# Altium PCB PCB1.PcbDoc
Units mil, origin at the board's own origin, x right, y up, seen from the top; angles counter-clockwise.
Board outline 1820 x 1620 mil, 2 copper layers (Top Layer, Bottom Layer); 51 components, 47 nets, 263 pads, 229 vias.
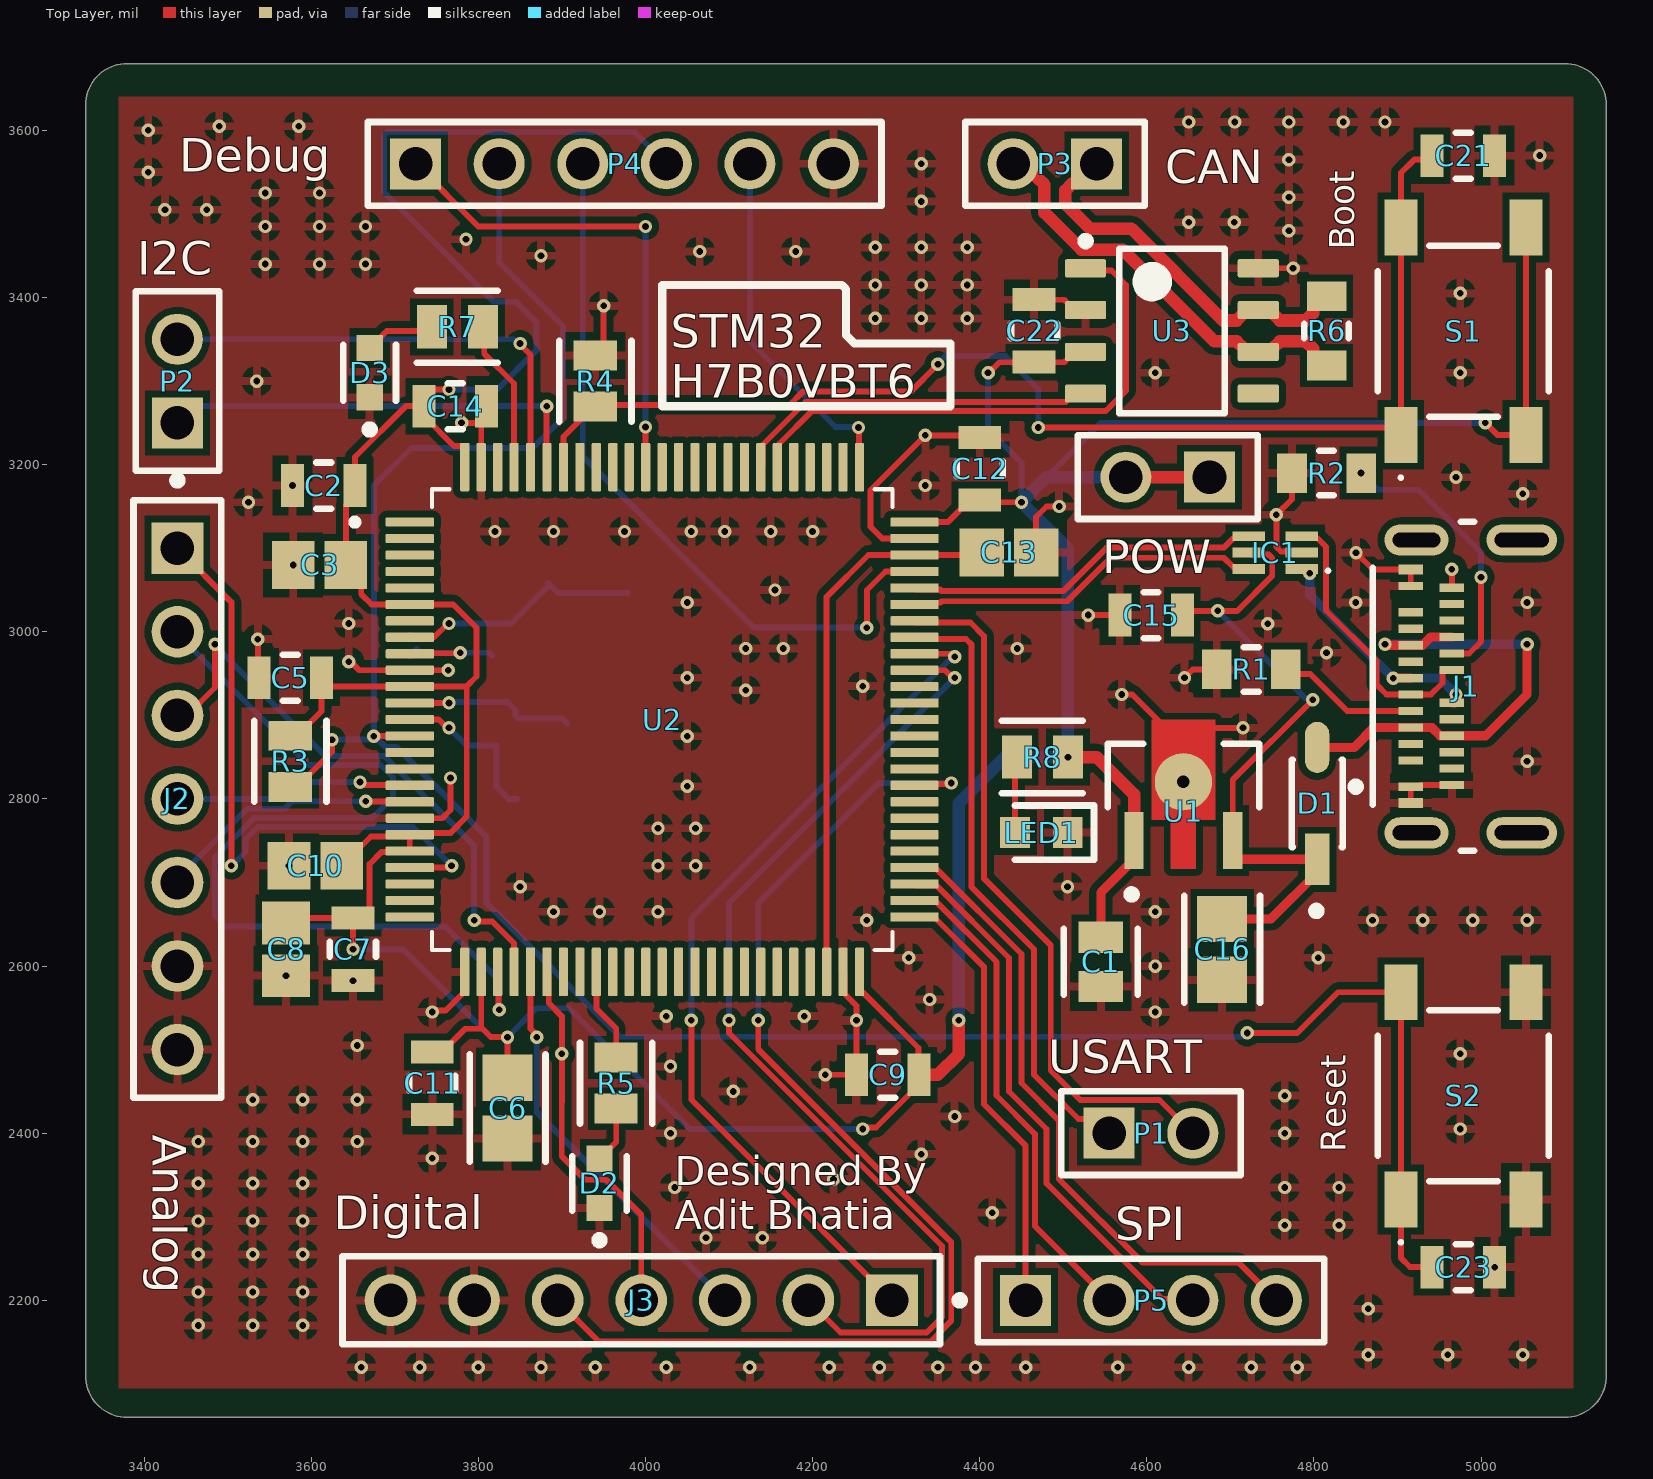
[diagram p0: Top Layer view]
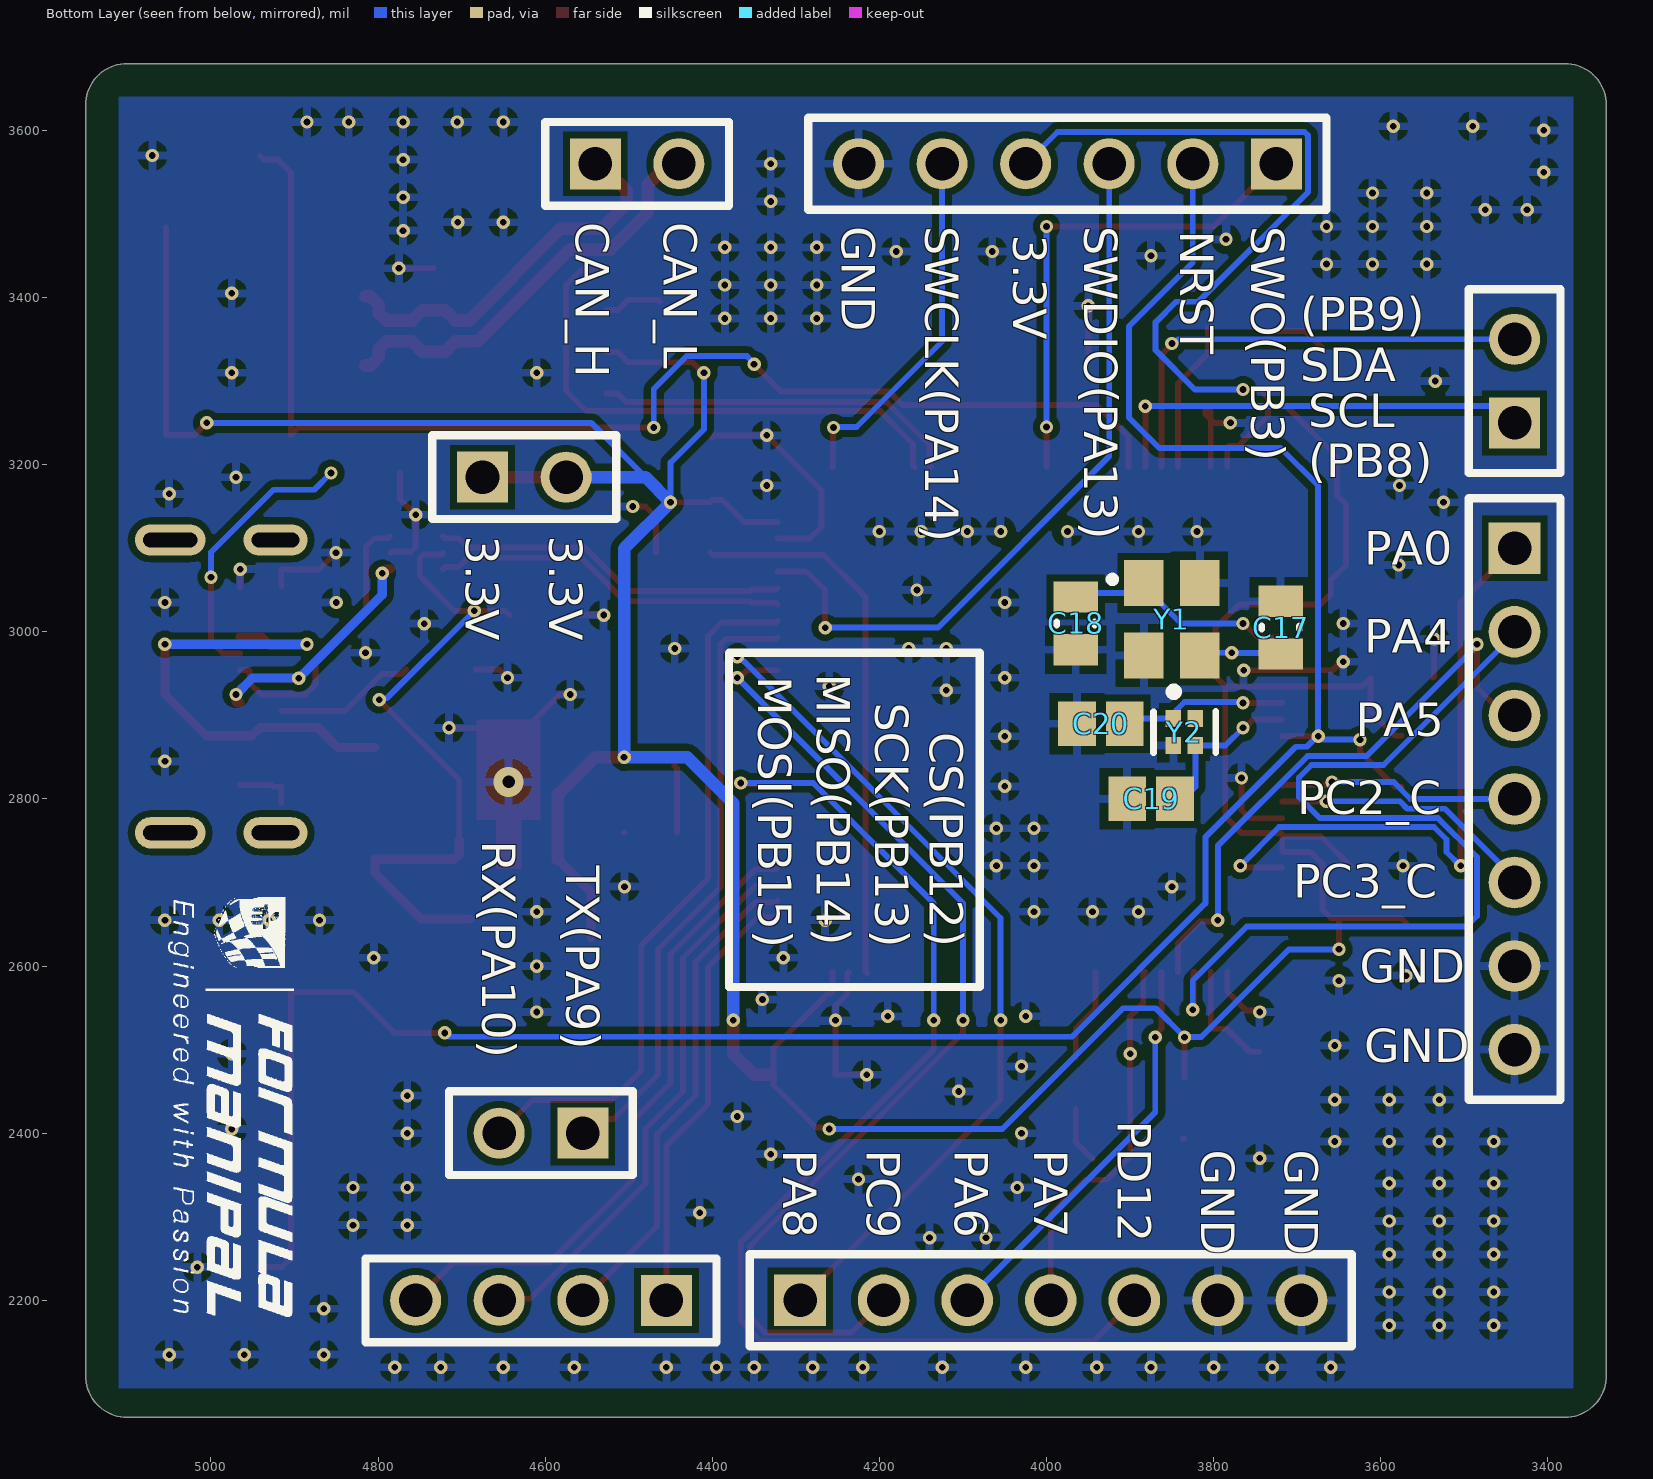
[diagram p1: Bottom Layer view, seen from below]
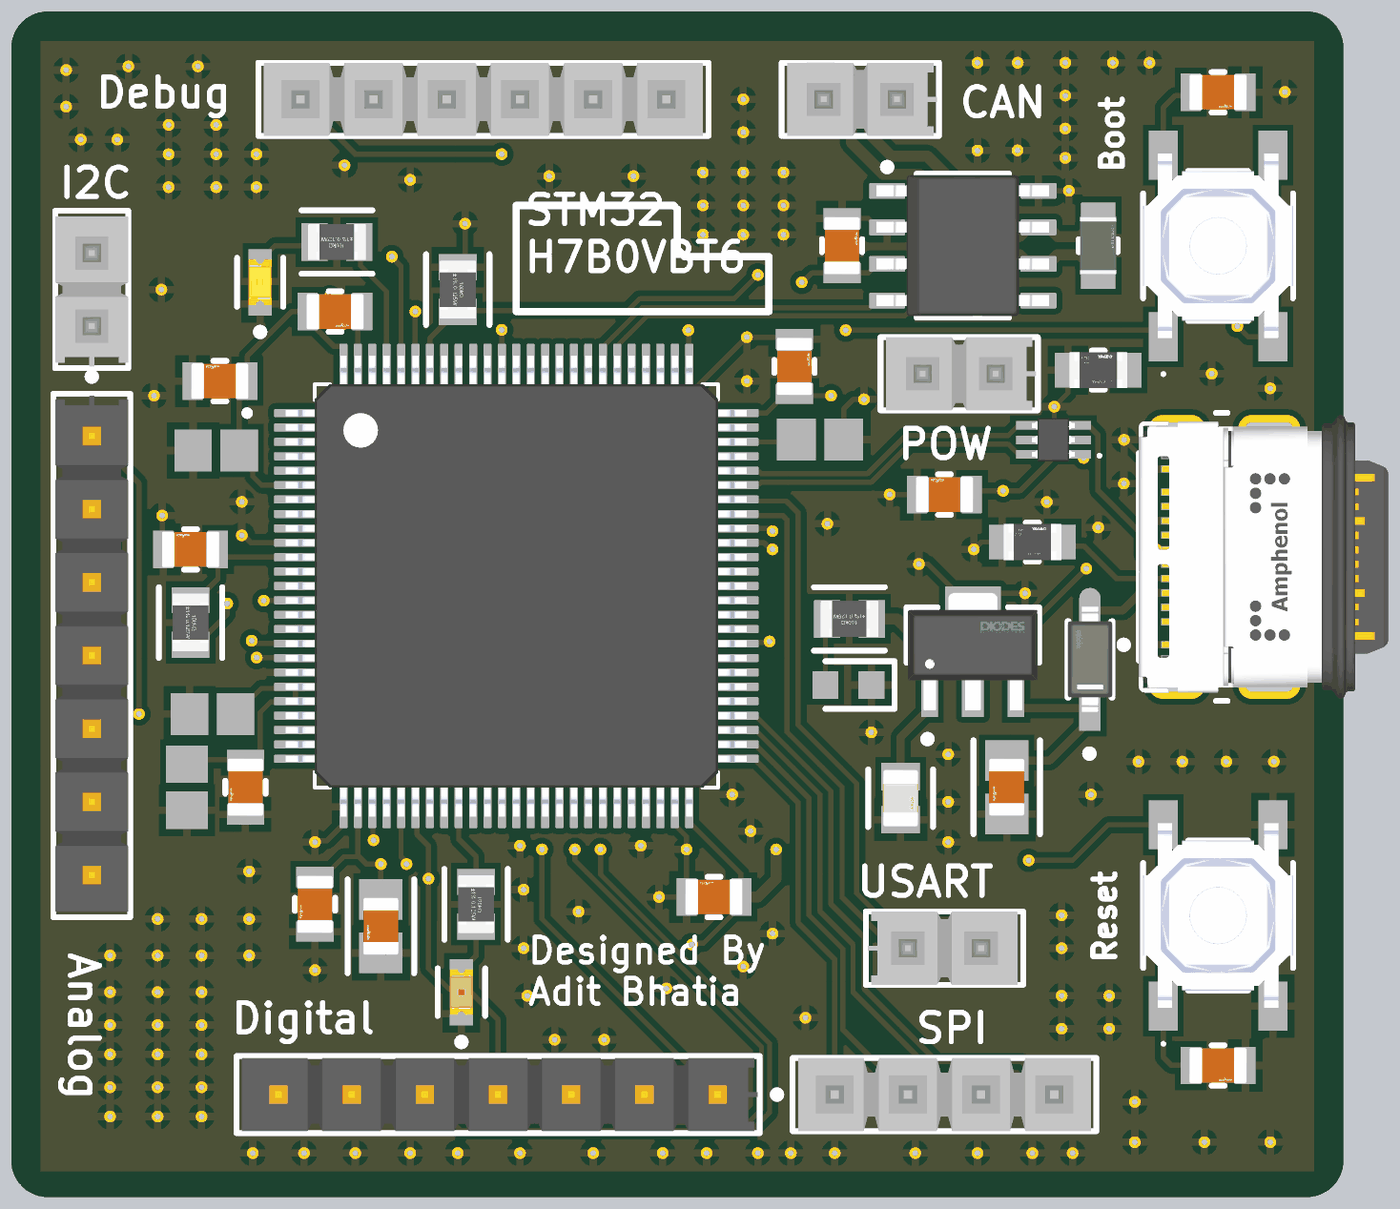
[diagram p2: 3D render of the assembled board from above, using the file's embedded part models]

## Layer stack, top to bottom
Top Solder: solder mask 0.4, Solder Resist, Dk 3.5
Top Layer: signal copper 1.4
Dielectric 1: dielectric 12.6, FR-4, Dk 4.8
Bottom Layer: signal copper 1.4
Bottom Solder: solder mask 0.4, Solder Resist, Dk 3.5

## Board outline
3330,2110 3330,3630 cw(c3380,3630) 3380,3680 5100,3680 cw(c5100,3630) 5150,3630 5150,2110 cw(c5100,2110) 5100,2060 3380,2060 cw(c3380,2110)

## Design rules (kind name [scope] priority, off if disabled: settings)
Clearance [All] p1: gap=8 ignorepadtopadclearanceinfootprint=FALSE except(4: Arc-Arc Arc-Track Arc-SMDPad Arc-THPad Track-Track Track-SMDPad Track-THPad SMDPad-THPad; 5.91: SMDPad-SMDPad; 10: Arc-Text Arc-Hole Track-Text Track-Hole SMDPad-Text SMDPad-Hole THPad-THPad THPad-Text THPad-Hole Via-Text Via-Hole Fill-Text Fill-Hole Poly-Text Poly-Hole Region-Text Region-Hole Text-Text Text-Hole)
DiffPairsRouting [All] p1: maxlimit=10 minlimit=4 mostfreqgap=5 toplayer_minwidth=5 toplayer_maxwidth=15 toplayer_prefwidth=7 bottomlayer_minwidth=5 bottomlayer_maxwidth=15 bottomlayer_prefwidth=7 maxuncoupledlength=500
MinimumSolderMaskSliver [All] p1: minsoldermaskwidth=6
PolygonConnect [All] p1: connectstyle=Relief reliefconductorwidth=10 reliefentries=4 polygonreliefangle="90 Angle" airgapwidth=10
RoutingVias [All] p1: holewidth=8 width=16 viastyle="Through Hole" minholewidth=8 minwidth=4 maxholewidth=28 maxwidth=50
SilkToSilkClearance [All] p1: silktosilkclearance=6
SilkToSolderMaskClearance [IsPad] p1: minsilkscreentomaskgap=6 clearancetoexposedcopper=TRUE
SolderMaskExpansion [All] p1: expansion=0 istentingtop=FALSE
SupplyNets "Schematic Supply Nets" [InNet('GND')] p1: voltage=0.000
Width [All] p1: maxlimit=20 minlimit=4 preferedwidth=10 minimp=50.000000 maximp=50.000000 favimp=50.000000
26 further rules are at their usual default settings.

## Classes and differential pairs
differential pair Port: +Port_D+ -Port_D-
differential pair USB: +USB_D+ -USB_D-
differential pair CAN: +CAN_H -CAN_L

## Components (designator, comment, footprint, x,y, rotation, side; value= is the part's Value field where it differs from the comment)
C1 "10uF" FP-C0805C106K4PACTU-MFG 4545,2605 r270 top
C2 "100nF" FP-GCD21B-0_15-MFG 3615,3175 r180 top
C3 "1uF" CAPC2013X140X50NL20T25 3610,3080 r0 top
C5 "100nF" FP-GCD21B-0_15-MFG 3575,2945 r180 top
C6 "4.7uF" FP-GRM21B-0_15-IPC_A 3835,2430 r270 top
C7 "100nF" FP-GCD21B-0_15-MFG 3650,2620 r270 top
C8 "1uF" CAPC2013X140X50NL20T25 3570,2620 r90 top
C9 "100nF" FP-GCD21B-0_15-MFG 4290,2470 r180 top
C10 "1uF" CAPC2013X140X50NL20T25 3605,2720 r0 top
C11 "100nF" FP-GCD21B-0_15-MFG 3745,2460 r270 top
C12 "100nF" FP-GCD21B-0_15-MFG 4400,3195 r90 top
C13 "2.2uF" CAPC2013X152X50NL20T25 4435,3095 r180 top
C14 "100nF" FP-GCD21B-0_15-MFG 3772.4,3270 r0 top
C15 "100nF" FP-GCD21B-0_15-MFG 4605,3020 r180 top
C16 "4.7uF" FP-GRM21B-0_15-IPC_A 4690,2620 r270 top
C17 "12pF" CAPC0805(2012)100_L 3720,3005 r270 bottom
C18 "12pF" CAPC0805(2012)100_L 3965,3010 r270 bottom
C19 "6pF" CAPC2013X94X50LL20T25 3875,2800 r180 bottom
C20 "6pF" CAPC2013X94X50LL20T25 3935,2890 r180 bottom
C21 "100nF" FP-GCD21B-0_15-MFG 4978.74,3569.68 r0 top
C22 "100nF" FP-GCD21B-0_15-MFG 4465,3360 r90 top
C23 "100nF" FP-GCD21B-0_15-MFG 4978.74,2239.68 r0 top
D1 "1N5819HW-7-F" FP-SOD123-IPC_A 4803.74,2794.68 r90 top
D2 "LTST-C190KRKT" FP-LTST-C190KRKT-MFG 3945,2340 r90 top
D3 "LTST-C191GKT" FP-LTST-C191GKT-MFG 3670,3310 r90 top
IC1 "USBLC62P6" USBLC62P6 4753.74,3094.68 r90 top
J1 "124018802112A" FP-124018802112A-MFG 5043.74,2934.68 r90 top
J2 "TSW-107-07-G-S" FP-TSW-107-07-G-S-MFG 3440,2800 r270 top
J3 "TSW-107-07-G-S" FP-TSW-107-07-G-S-MFG 3995,2200 r180 top
LED1 "LTST-C191KFKT" LEDC1608X55N 4473.74,2759.68 r180 top
P1 "TSW-102-26-F-S" SMTC-TSW-102-26-XX-S 4555,2400 r0 top
P2 "TSW-102-26-F-S" SMTC-TSW-102-26-XX-S 3440,3250 r90 top
P3 "TSW-102-26-F-S" SMTC-TSW-102-26-XX-S 4540,3560 r180 top
P4 "Debug Pins" SMTC-TSW-106-23-X-S 3725,3560 r0 top
P5 "TSW-104-08-G-S" SMTC-TSW-104-08-X-S 4455,2200 r0 top
POW "TSW-102-26-F-S" SMTC-TSW-102-26-XX-S 4675,3185 r180 top
R1 "5.1k" FP-RT0805-MFG 4725,2955 r0 top value=5.1KΩ
R2 "5.1k" FP-RT0805-MFG 4815,3190 r0 top value=5.1KΩ
R3 "10k" FP-CRGCQ0805-IPC_C 3575,2845 r270 top value=10KΩ
R4 "10k" FP-CRGCQ0805-IPC_C 3940,3300 r270 top value=10KΩ
R5 "10k" FP-CRGCQ0805-IPC_C 3965,2460 r270 top value=10KΩ
R6 "120R" FP-AC0805-MFG 4815,3360 r90 top value=120Ω
R7 "10k" FP-CRGCQ0805-IPC_C 3775,3365 r180 top value=10KΩ
R8 "10k" FP-CRGCQ0805-IPC_C 4475,2850 r180 top value=10KΩ
S1 "TS18-5-15-SL-260-SMT-TR" TS18515SL260SMTTR 4978.74,3359.68 r90 top
S2 "TS18-5-15-SL-260-SMT-TR" TS18515SL260SMTTR 4978.74,2444.68 r90 top
U1 "AP7381-33Y-13" FP-SOT89-MFG 4643.74,2814.68 r0 top
U2 "STM32H7B0VBT6" QFP50P1600X1600X160-100N 4020,2895 r0 top
U3 "SN65HVD230MDREP" D0008A_L 4630,3360 r0 top
Y1 "ABM8G-12.288MHZ-B4Y-T" ABM8G 3850,3015 r270 bottom
Y2 "ABS04W-32.768KHZ-6-D2-T5" FP-ABS04W-MFG 3835,2880 r270 bottom

## Footprints (in the part's own frame and the unit in brackets; to place one, negate y for a bottom-side part, rotate by r counter-clockwise, add the part's x,y. Pads: shape width x height; smd on the part's side, far side on the other; paste and mask are expansions set on the pad)
ABM8G [mm]
  rect 1.4x1.2 smd: 1(-1.1,-0.85) 2(1.1,-0.85) 3(1.1,0.85) 4(-1.1,0.85)
  silkscreen extent -1.29,-1.89 -1.14,-1.73, body extent -1.61,-1.32 1.6,1.17, height 1
CAPC0805(2012)100_L [mm] "Chip Capacitor, Body 2.0x1.2mm, Height 1.0mm, IPC High Density"
  rect 0.95x1.35 smd: 1(-0.8,0) 2(0.8,0)
  silkscreen extent -0.05,-0.58 0.05,0.58, body extent -1.1,-0.72 1.1,0.72, height 1
CAPC2013X94X50LL20T25 [mm] "Chip Capacitor, 2-Leads, Body 2.01x1.25mm, IPC High Density"
  rect 1.15x1.35 smd: 1(-0.725,0) 2(0.725,0)
  body extent -1.1,-0.72 1.1,0.72, height 0.94
CAPC2013X140X50NL20T25 [mm] "Chip Capacitor, 2-Leads, Body 2.00x1.25mm, IPC Medium Density"
  rect 1.3x1.45 smd: 1(-0.8,0) 2(0.8,0)
  body extent -1.1,-0.72 1.1,0.72, height 1.4
CAPC2013X152X50NL20T25 [mm] "Chip Capacitor, 2-Leads, Body 2.01x1.25mm, IPC Medium Density"
  rect 1.35x1.45 smd: 1(-0.825,0) 2(0.825,0)
  body extent -1.1,-0.72 1.11,0.72, height 1.52
D0008A_L [mm] "SOIC, 8-Leads, Body 5x4mm, Pitch 1.27mm, IPC High Density"
  rrect18% 1.25x0.55 smd: 1(-2.625,1.905) 2(-2.625,0.635) 3(-2.625,-0.635) 4(-2.625,-1.905) 5(2.625,-1.905) 6(2.625,-0.635) 7(2.625,0.635) 8(2.625,1.905)
  silkscreen extent -2.75,-2.5 1.6,2.85, body extent -3,-2.45 3,2.45, height 1.63
FP-124018802112A-MFG [mm]
  rect 0.3x0.75 smd paste+0 mask+0: 1(-3.55,3.25) 2(3.55,3.25)
  rrect100% 0.95x1.95 hole 1.45 slot 0.45 at 0 deg paste-2539.97 mask+0: 3(-4.45,3.075) 4(4.45,3.075)
  rrect100% 0.95x2.15 hole 1.65 slot 0.45 at 0 deg paste-2539.97 mask+0: 5(-4.45,-0.125) 6(4.45,-0.125)
  rect 0.25x0.75 smd paste+0 mask+0: A1(-3.05,3.25) A2(-2.25,3.25) A3(-1.75,3.25) A4(-1.25,3.25) A5(-0.75,3.25) A6(-0.25,3.25) A7(0.25,3.25) A8(0.75,3.25) A9(1.25,3.25) A10(1.75,3.25) A11(2.25,3.25) A12(3.05,3.25) B1(3,2) B2(2.5,2) B3(2,2) B4(1.5,2) B5(1,2) B6(0.5,2) B7(-0.5,2) B8(-1,2) B9(-1.5,2) B10(-2,2) B11(-2.5,2) B12(-3,2)
  silkscreen extent -5,1.33 5,5.05, body extent -5.1,-4.5 5.1,4.5, height 0.25
FP-ABS04W-MFG [mm]
  rect 0.52x0.47 smd paste+0 mask+0: 1(-0.41,-0.335) 2(0.41,-0.335) 3(0.41,0.335) 4(-0.41,0.335)
  silkscreen extent -1.35,-0.94 0.63,0.95, body extent -0.6,-0.5 0.6,0.5, height 0.35
FP-AC0805-MFG [mm]
  rect 0.9x1.2 smd paste+0 mask+0: 1(-1.05,0) 2(1.05,0)
  silkscreen extent -0.23,-0.67 0.23,0.67, body extent -1.6,-0.77 1.6,0.77, height 0.25
FP-C0805C106K4PACTU-MFG [mm]
  rect 0.95x1.35 smd paste+0 mask+0: 1(-0.75,0) 2(0.75,0)
  silkscreen extent -1,-1.12 1,1.12, body extent -1.4,-0.85 1.4,0.85, height 0.25
FP-CRGCQ0805-IPC_C [mil]
  rect 35.67x51.57 smd paste+0 mask+0: 1(-30.55,0) 2(30.55,0)
  silkscreen extent -48,-43 48,43, body extent -52,-31 52,31, height 10
FP-GCD21B-0_15-MFG [mm]
  rect 0.7x1.3 smd paste+0 mask+0: 1(-0.95,0) 2(0.95,0)
  silkscreen extent -0.23,-0.7 0.23,0.7, body extent -1.4,-0.8 1.4,0.8, height 0.25
FP-GRM21B-0_15-IPC_A [mil]
  rect 55.34x59.38 smd paste+0 mask+0: 1(-36.47,0) 2(36.47,0)
  silkscreen extent -64,-45 64,45, body extent -84,-49 84,49, height 10
FP-LTST-C190KRKT-MFG [mm]
  rect 0.8x0.8 smd paste+0 mask+0: 1(-0.75,0) 2(0.75,0)
  silkscreen extent -1.85,-0.82 0.82,0.82, body extent -1.25,-0.55 1.25,0.55, height 0.25
FP-LTST-C191GKT-MFG [mm]
  rect 0.8x0.8 smd paste+0 mask+0: 1(-0.75,0) 2(0.75,0)
  silkscreen extent -1.85,-0.8 0.85,0.8, body extent -1.25,-0.55 1.25,0.55, height 0.25
FP-RT0805-MFG [mm]
  rect 0.9x1.2 smd paste+0 mask+0: 1(-1.05,0) 2(1.05,0)
  silkscreen extent -0.23,-0.67 0.23,0.67, body extent -1.6,-0.77 1.6,0.77, height 0.25
FP-SOD123-IPC_A [mil]
  rect 61.32x29.23 smd paste+0 mask+0: 1(-66.94,0)
  rrect100% 61.32x29.23 smd paste+0 mask+0: 2(66.94,0)
  silkscreen extent -134,-31 52,31, body extent -117,-50 117,50, height 10
FP-SOT89-MFG [mm]
  rect 0.58x1.73 smd paste+0 mask+0: 1(-1.5,-1.635) 3(1.5,-1.635)
  round 1.74 smd paste+0 mask+0: 2(0,0.146)
  Top Layer region: -0.38,-2.5 -0.38,-1 -0.967,-1 -0.967,2.03 0.967,2.03 0.967,-1 0.38,-1 0.38,-2.5
  silkscreen extent -2.3,-3.4 2.3,1.3, body extent -2.4,-2.6 2.4,2.13, height 0.25
FP-TSW-107-07-G-S-MFG [mm]
  rect 1.57x1.57 hole 1.02 paste-2539.97 mask+0: 1(-7.62,0)
  round 1.57 hole 1.02 paste-2539.97 mask+0: 2(-5.08,0) 3(-2.54,0) 4(0,0) 5(2.54,0) 6(5.08,0) 7(7.62,0)
  silkscreen extent -9.8,-1.34 9.08,1.34, body extent -9.18,-1.44 9.18,1.44, height 0.25
LEDC1608X55N [mm]
  rect 0.9x0.95 smd: 1(-0.8,0) 2(0.8,0)
  silkscreen extent -1.6,-0.82 0.8,0.82
QFP50P1600X1600X160-100N [mm]
  rrect25% 1.47x0.28 smd: 1(-7.67,6) 2(-7.67,5.5) 3(-7.67,5) 4(-7.67,4.5) 5(-7.67,4) 6(-7.67,3.5) 7(-7.67,3) 8(-7.67,2.5) 9(-7.67,2) 10(-7.67,1.5) 11(-7.67,1) 12(-7.67,0.5) 13(-7.67,0) 14(-7.67,-0.5) 15(-7.67,-1) 16(-7.67,-1.5) 17(-7.67,-2) 18(-7.67,-2.5) 19(-7.67,-3) 20(-7.67,-3.5) 21(-7.67,-4) 22(-7.67,-4.5) 23(-7.67,-5) 24(-7.67,-5.5) 25(-7.67,-6) 51(7.67,-6) 52(7.67,-5.5) 53(7.67,-5) 54(7.67,-4.5) 55(7.67,-4) 56(7.67,-3.5) 57(7.67,-3) 58(7.67,-2.5) 59(7.67,-2) 60(7.67,-1.5) 61(7.67,-1) 62(7.67,-0.5) 63(7.67,0) 64(7.67,0.5) 65(7.67,1) 66(7.67,1.5) 67(7.67,2) 68(7.67,2.5) 69(7.67,3) 70(7.67,3.5) 71(7.67,4) 72(7.67,4.5) 73(7.67,5) 74(7.67,5.5) 75(7.67,6)
  rrect25% 0.28x1.47 smd: 26(-6,-7.67) 27(-5.5,-7.67) 28(-5,-7.67) 29(-4.5,-7.67) 30(-4,-7.67) 31(-3.5,-7.67) 32(-3,-7.67) 33(-2.5,-7.67) 34(-2,-7.67) 35(-1.5,-7.67) 36(-1,-7.67) 37(-0.5,-7.67) 38(0,-7.67) 39(0.5,-7.67) 40(1,-7.67) 41(1.5,-7.67) 42(2,-7.67) 43(2.5,-7.67) 44(3,-7.67) 45(3.5,-7.67) 46(4,-7.67) 47(4.5,-7.67) 48(5,-7.67) 49(5.5,-7.67) 50(6,-7.67) 76(6,7.67) 77(5.5,7.67) 78(5,7.67) 79(4.5,7.67) 80(4,7.67) 81(3.5,7.67) 82(3,7.67) 83(2.5,7.67) 84(2,7.67) 85(1.5,7.67) 86(1,7.67) 87(0.5,7.67) 88(0,7.67) 89(-0.5,7.67) 90(-1,7.67) 91(-1.5,7.67) 92(-2,7.67) 93(-2.5,7.67) 94(-3,7.67) 95(-3.5,7.67) 96(-4,7.67) 97(-4.5,7.67) 98(-5,7.67) 99(-5.5,7.67) 100(-6,7.67)
  silkscreen extent -9.44,-7 7,7, body extent -8,-8 8,8, height 1.6
SMTC-TSW-102-26-XX-S [mm] ".025 SQ Post Terminal Strip Assembly, 1x2 Pins, Vertical, 2.54mm Pitch, Male"
  rect 1.55x1.55 hole 1.02: 1(0,0)
  round 1.55 hole 1.02: 2(2.54,0)
  silkscreen extent -1.46,-1.27 4,1.27, body extent -1.4,-1.27 3.81,1.27, height 8.38
SMTC-TSW-104-08-X-S [mm] ".025 SQ Post Terminal Strip Assembly, 1x4 Pins, Vertical, 2.54mm Pitch, Male"
  rect 1.55x1.55 hole 1.02: 1(0,0)
  round 1.55 hole 1.02: 2(2.54,0) 3(5.08,0) 4(7.62,0)
  silkscreen extent -1.46,-1.27 9.08,1.27, body extent -1.27,-1.27 8.89,1.27, height 8.38
SMTC-TSW-106-23-X-S [mm] ".025 SQ Post Terminal Strip Assembly, 1x6 Pins, Vertical, 2.54mm Pitch, Male"
  rect 1.55x1.55 hole 1.02: 1(0,0)
  round 1.55 hole 1.02: 2(2.54,0) 3(5.08,0) 4(7.62,0) 5(10.16,0) 6(12.7,0)
  silkscreen extent -1.46,-1.27 14.16,1.27, body extent -1.27,-1.27 13.97,1.27, height 8.38
TS18515SL260SMTTR [mm]
  rect 1.7x1 smd: 1(-3.15,1.9) 2(3.15,1.9) 3(-3.15,-1.9) 4(3.15,-1.9)
  silkscreen extent -4.5,-2.6 2.6,2.6, body extent -3.2,-2.6 3.2,2.6, height 1.5
USBLC62P6 [mm]
  rect 0.3x0.99 smd: 1(-0.5,-0.805) 2(0,-0.805) 3(0.5,-0.805) 4(0.5,0.805) 5(0,0.805) 6(-0.5,0.805)
  silkscreen extent -0.6,-1.65 -0.5,-1.55, body extent -0.75,-0.75 0.75,0.75, height 0.46

## Part data
C1: library part CMP-03020-034671-1, "CAP CER 10UF 16V X5R 0805", Case Code (Imperial)=0805, Case Code (Metric)=2012, Dielectric=X5R, Dielectric Material=Ceramic, Max Operating Temperature=85°C, Min Operating Temperature=-55°C, Package Quantity=1, Tolerance=10%, Voltage=16V, Capacitance=10uF, Case/Package=0805, Construction=Flat, Contact Plating=Tin, Depth=1.25mm, Dissipation Factor=5%, Height=1.25mm, Lead Free="Lead Free", Length=2mm, Mount="Surface Mount", Number of Pins=2, Packaging="Tape and Reel", Radiation Hardening=No, REACH SVHC="No SVHC", Series=C, Termination=SMD/SMT, Thickness=0.055inch, Voltage Rating=16V, Voltage Rating (DC)=16V, Width=0.049inch
C2 C5 C7 C9 C11 C12 C14 C15 C21 C22 C23: library part CMP-06035-062053-1, "Chip Multilayer Ceramic Capacitors for Automotive, 0805, 0.10uF, X7R, 15%, 20%, 100V, Grade 1"
C3 C8 C10: library part CMP-2007-04663-1, Manufacturer="AVX Interconnect / Elco", Part Number=0805YD105MAT2A
C6 C16: library part CMP-06035-033280-1, "Chip Multilayer Ceramic Capacitors for General Purpose, 0805, 4.7uF, X6S, 22%, 20%, 35V", Case/Package=0805, Dielectric=X6S, Tolerance=20%, Voltage Rating (DC)=35V, Capacitance=4.7uF, Length=2mm, Thickness=1.25mm, Width=1.25mm
C13: library part CMP-2007-04517-1, Manufacturer="AVX Interconnect / Elco", Part Number=0805YC225KAT2A
C17 C18: library part CMP-1036-00968-1, "CAP 12pF 100V ±10% 0805 (2012 Metric) Thickness 1mm SMD", Case-EIA=0805, Case-Metric=2012, Rated Voltage="100 V", Tolerance=Â±10%, Max Thickness="1 mm", Technology=SMT
C19 C20: library part CMP-2007-04344-1, Manufacturer="AVX Interconnect / Elco", Part Number=08055A6R0CAT2A
D1: library part CMP-0303-00003-3, "DIODE SCHOTTKY 40V 1A SOD123", Average Rectified Current=1A, Capacitance=110pF, Case/Package=SOD-123-2, Forward Voltage=450mV, Max Forward Surge Current (Ifsm)=25A, Max Operating Temperature=125°C, Max Power Dissipation=450mW, Max Repetitive Reverse Voltage (Vrrm)=40V, Min Operating Temperature=-65°C, Package Quantity=3000, Peak Reverse Current=50uA, Contact Plating=Tin, Current Rating=1A, Element Configuration=Single, Forward Current=1A, Height=1.25mm, Lead Free="Lead Free", Length=2.85mm, Max Reverse Voltage (DC)=40V, Number of Pins=2, Output Current=1A, Packaging="Tape and Reel", Peak Non-Repetitive Surge Current=25A, Polarity=Standard, Radiation Hardening=No, REACH SVHC="No SVHC", Termination=SMD/SMT, Voltage Rating (DC)=40V, Weight=0.000353oz, Width=1.7mm
D2: library part CMP-1674-00011-2, "LED RED CLEAR CHIP SMD", Case Code (Imperial)=0603, Case Code (Metric)=1608, Color=Red, Forward Current=30mA, Forward Voltage=2.4V, Lens Color=Colorless, Max Operating Temperature=85°C, Min Operating Temperature=-55°C, Package Quantity=1, Power Dissipation=75mW, Reverse Voltage=5V, Test Current=20mA, Case/Package=0603, Depth=0.8mm, Dominant Wavelength=631nm, Height=0.8mm, Illumination Color=Red, Lead Free="Lead Free", Length=1.6mm, Lens Style=Diffused, Lens Transparency=Clear, Luminous Intensity=54mcd, Mount="Surface Mount", Number of Elements=1, Number of LEDs=1, Number of Pins=2, Packaging="Tape and Reel", Power Rating=75mW, Radiation Hardening=No, Viewing Angle=130°, Wavelength=639nm, Width=0.8mm
D3: library part CMP-22017-000029-1, "LED GREEN CLEAR CHIP SMD", Case Code (Imperial)=0603, Case Code (Metric)=1608, Color=Green, Forward Current=30mA, Forward Voltage=2.1V, Lens Color=Colorless, Max Operating Temperature=85°C, Min Operating Temperature=-55°C, Package Quantity=1, Power Dissipation=100mW, Reverse Voltage=5V, Test Current=20mA, Case/Package=0603, Depth=0.8mm, Dominant Wavelength=569nm, Height=0.55mm, Illumination Color=Green, Lead Free="Lead Free", Length=1.6mm, Lens Style=Clear, Lens Transparency=Clear, Luminous Intensity=12mcd, Mount="Surface Mount", Number of Elements=1, Number of LEDs=1, Number of Pins=2, Packaging="Tape and Reel", Power Rating=100mW, Radiation Hardening=No, Viewing Angle=130°, Wavelength=565nm, Width=0.8mm
IC1: "Integrated Circuit", Manufacturer_Name=STMicroelectronics, Datasheet Link=https://datasheet.lcsc.com/szlcsc/STMicroelectronics-USBLC6-2P6_C15999.pdf, Height=0.6mm, Manufacturer_Part_Number=USBLC62P6
J1: library part CMP-02355-000005-1, "USB TYPE C, RECEPTACLE, TOP MOUN"
J2 J3: library part CMP-02766-000065-1, "CONN HEADER VERT 7POS 2.54MM", Manufacturer=SAMTEC, Package=0, Temperature="-55°C to +125°C", Temperature Range High=+125°C, Temperature Range Low=-55°C, Automotive=No, Category=Conn, ComponentLink2Description=Datasheet, ComponentLink2URL=http://suddendocs.samtec.com/prints/tsw-xxx-xx-xxx-x-xx-xxx-mkt.pdf, Conn Gender=Male, Conn Orientation=Straight, Contact Material=Gold,Nickel, Device Class L1=Connectors, Device Class L2="Headers and Wire Housings", Device Class L3=unset, Digikey Description="CONN HEADER VERT 7POS 2.54MM", Footprint Url=http://suddendocs.samtec.com/prints/tsw-xxx-xx-x-x-xx-xxx-footprint.pdf, Height=8.71mm, Lead Free=Yes, Manufacturer Part Number=TSW-107-07-G-S, Mouser Description="Conn Unshrouded Header HDR 7 POS 2.54mm Solder ST Thru-Hole Automotive Bulk", Number Of Contacts=7, Number Of Rows=1, Octopart=https://octopart.com/tsw-107-07-g-s-samtec-272202, Pitch=2.54mm, RoHS=TRUE
LED1: "LED", Manufacturer_Name=Lite-On, Mouser Part Number=859-LTST-C191KFKT, Arrow Part Number=LTST-C191KFKT, Arrow Price/Stock=https://www.arrow.com/en/products/ltst-c191kfkt/lite-on-technology.html?utm_currency=USD&region=nac, Datasheet Link=https://datasheet.datasheetarchive.com/originals/distributors/Datasheets-305/79307.pdf, Height=0.55mm, Manufacturer_Part_Number=LTST-C191KFKT, Mouser Price/Stock=https://www.mouser.co.uk/ProductDetail/Lite-On/LTST-C191KFKT?qs=1bx9pL%2Fk%252BiAv01YAc0eitQ%3D%3D
P1 P2 P3 POW: library part CMP-1024-00329-1, "0.025\" SQ Post Header, Through-hole, Vertical, -55 to 125 degC, 2.54 mm Pitch, 2-Pin, Male, RoHS", Manufacturer=Samtec, Temperature Range="-55 to 125 degC", ComponentLink1Description="Manufacturer URL", ComponentLink1URL=http://www.samtec.com, ComponentLink2Description=Datasheet, ComponentLink2URL=http://www.samtec.com/documents/webfiles/pdf/TSW_TH.PDF, ComponentLink3Description="Package Specification", ComponentLink3URL=http://www.samtec.com/documents/webfiles/cpdf/TSW-XXX-XX-XXX-X-XX-XXX-MKT.pdf, DatasheetVersion=F-214, Mounting Technology=Through-hole, Orientation=Vertical, PackageDescription=".025[0.64] SQ. Post Terminal Strip Assembly", PackageReference=TSW-102-26-XX-S, PackageVersion="DM, 8/1988", PartNumber=TSW-102-26-F-S, Pitch="2.54 mm", RoHS=True
P4: library part CMP-1024-00396-1, "0.025\" SQ Post Header, Through-hole, Vertical, -55 to 125 degC, 2.54 mm Pitch, 6-Pin, Male, RoHS", Manufacturer=Samtec, PartNumber=TSW-106-23-G-S, Temperature Range="-55 to 125 degC", ComponentLink1Description="Manufacturer URL", ComponentLink1URL=http://www.samtec.com, ComponentLink2Description=Datasheet, ComponentLink2URL=http://www.samtec.com/documents/webfiles/pdf/TSW_TH.PDF, ComponentLink3Description="Package Specification", ComponentLink3URL=http://www.samtec.com/documents/webfiles/cpdf/TSW-XXX-XX-XXX-X-XX-XXX-MKT.pdf, DatasheetVersion=F-214, Mounting Technology=Through-hole, Orientation=Vertical, PackageDescription=".025[0.64] SQ. Post Terminal Strip Assembly", PackageReference=TSW-106-23-X-S, PackageVersion="DM, 8/1988", Pitch="2.54 mm", RoHS=True
P5: library part CMP-1024-00357-1, "0.025\" SQ Post Header, Through-hole, Vertical, -55 to 125 degC, 2.54 mm Pitch, 4-Pin, Male, RoHS", Manufacturer=Samtec, Temperature Range="-55 to 125 degC", ComponentLink1Description="Manufacturer URL", ComponentLink1URL=http://www.samtec.com, ComponentLink2Description=Datasheet, ComponentLink2URL=http://www.samtec.com/documents/webfiles/pdf/TSW_TH.PDF, ComponentLink3Description="Package Specification", ComponentLink3URL=http://www.samtec.com/documents/webfiles/cpdf/TSW-XXX-XX-XXX-X-XX-XXX-MKT.pdf, DatasheetVersion=F-214, Mounting Technology=Through-hole, Orientation=Vertical, PackageDescription=".025[0.64] SQ. Post Terminal Strip Assembly", PackageReference=TSW-104-08-X-S, PackageVersion="DM, 8/1988", PartNumber=TSW-104-08-G-S, Pitch="2.54 mm", RoHS=True
R1 R2: library part CMP-2001-01553-2, "RES SMD 5.1K OHM 0.1% 1/8W 0805", Manufacturer=Yageo, Manufacturer Part Number=RT0805BRD075K1L, Package=RT0805, Power Rating=0.125W, Resistance=5.1KΩ, Temperature="-55°C to +155°C", Temperature Coefficient="25 ppm/°C", Temperature Range High=+155°C, Temperature Range Low=-55°C, Tolerance=0.0025, Voltage Rating=150V, Automotive=No, Category=Res, ComponentLink2Description=Datasheet, ComponentLink2URL=http://www.yageo.com/documents/recent/PYu-RT_1-to-0.01_RoHS_L_9.pdf, Composition="Thin Film", Device Class L1="Passive Components", Device Class L2=Resistors, Device Class L3="Chip SMD Resistors", Digikey Description="RES SMD 5.1K OHM 0.1% 1/8W 0805", Footprint Url=http://www.yageo.com/exep/pages/download/literatures/PYu-R_Mount_10.pdf, Height=0.6mm, Ipc Land Pattern Name=RESC200125X50, Lead Free=Yes, Mouser Description="Res Thin Film 0805 5.1K Ohm 0.1% 1/8W ±10ppm/°C Molded SMD Paper T/R", Octopart=https://octopart.com/rt0805brd075k1l-yageo-1209369, RoHS=TRUE, Series=RT
R3 R4 R5 R7 R8: library part CMP-03211-002989-1, "CRGCQ 0805 10K 5%", Ambient Temperature Range High=+70°C, Manufacturer="TE Connectivity", Manufacturer Part Number=CRGCQ0805J10K, Package=CRGCQ0805, Power Rating=0.125W, Resistance=10KΩ, Temperature="-55°C to +155°C", Temperature Coefficient=±100ppm/°C, Temperature Range High=+155°C, Temperature Range Low=-55°C, Tolerance=0.05, Voltage Rating=150V, Automotive=Yes, Automotive Grade="Grade 914", Category=Res, ComponentLink2Description=Datasheet, ComponentLink2URL=https://www.te.com/commerce/DocumentDelivery/DDEController?Action=showdoc&DocId=Data+Sheet%7F1773204-3%7F1%7Fpdf%7FEnglish%7FENG_DS_1773204-3_1.pdf%7F4-2176341-923, Composition="Thick Film", Device Class L1="Passive Components", Device Class L2=Resistors, Device Class L3="Chip SMD Resistors", Digikey Description="CRGCQ 0805 10K 5%", Height=0.65mm, Ipc Land Pattern Name=RESC200125X55, Lead Free=Yes, Mouser Description="Res Thick Film 0805 10K Ohm 5% 0.125W(1/8W) ±100ppm/C Pad SMD Automotive T/R", Octopart=https://octopart.com/crgcq0805j10k-te+connectivity-91018201, RoHS=TRUE, Series=CRGCQ
R6: library part CMP-03412-037390-1, "RES SMD 120 OHM 5% 1/8W 0805", Manufacturer=Yageo, Manufacturer Part Number=AC0805JR-07120RL, Package=AC0805, Power Rating=1/8W, Resistance=120Ω, Temperature="-55°C to +155°C", Temperature Range High=+155°C, Temperature Range Low=-55°C, Tolerance=0.05, Voltage Rating=150V, Automotive=Yes, Automotive Grade="Grade 0", Category=Res, ComponentLink2Description=Datasheet, ComponentLink2URL=http://www.yageo.com/documents/recent/PYu-AC_51_RoHS_L_6.pdf, Composition="Thick Film", Device Class L1="Passive Components", Device Class L2=Resistors, Device Class L3="Chip SMD Resistors", Digikey Description="RES SMD 120 OHM 5% 1/8W 0805", Footprint Url=http://www.yageo.com/exep/pages/download/literatures/PYu-R_Mount_10.pdf, Height=0.6mm, Ipc Land Pattern Name=RESC200125X50, Lead Free=Yes, Mouser Description="Thick Film Resistors - SMD 1/8W 120ohm 5% AEC-Q200", Octopart=https://octopart.com/ac0805jr-07120rl-yageo-52448213, RoHS=TRUE, Series=AC
S1 S2: "Switch (4-Pin Push)", Manufacturer_Name="Same Sky", Mouser Part Number=179-TS18515SL260SMTT, Arrow Part Number=TS18-5-15-SL-260-SMT-TR, Arrow Price/Stock=https://www.arrow.com/en/products/ts18-5-15-sl-260-smt-tr/cui-devices?utm_currency=USD&region=nac, Datasheet Link=https://www.sameskydevices.com/product/resource/ts18.pdf, Height=1.6mm, Manufacturer_Part_Number=TS18-5-15-SL-260-SMT-TR, Mouser Price/Stock=https://www.mouser.co.uk/ProductDetail/CUI-Devices/TS18-5-15-SL-260-SMT-TR?qs=tlsG%2FOw5FFh4WzqzrHrOOQ%3D%3D
U1: library part CMP-12756-000003-1, "IC REG LINEAR 3.3V 150MA SOT89", Ambient Temperature Range High=+85°C, Ambient Temperature Range Low=-40°C, Dropout Voltage=1000mV, Manufacturer="Diodes Inc.", Max Junction Temp=+125°C, Max Supply Voltage=40V, Min Supply Voltage=3.3V, Nominal Supply Current=2.5-25uA, Output Current=150mA, Package=SOT89, Temperature="-40°C to +125°C", Automotive=No, Category=IC, ComponentLink2Description=Datasheet, ComponentLink2URL=https://www.diodes.com/assets/Datasheets/AP7381.pdf, Device Class L1="Integrated Circuits (ICs)", Device Class L2="Power Management ICs", Device Class L3="Voltage Regulators - Linear", Digikey Description="IC REG LINEAR 3.3V 150MA SOT89", Footprint Url=https://www.diodes.com/assets/Package-Files/SOT89.pdf, Height=1.6mm, Lead Free=Yes, Manufacturer Part Number=AP7381-33Y-13, Number Of Outputs=1, Octopart=https://octopart.com/ap7381-33y-13-diodes+inc.-87775115, Output Type=Fixed, Output Voltage=3.3V, RoHS=TRUE, Temperature Range High=+125°C, Temperature Range Low=-40°C
U2: library part CMP-010-000016-1, "ARMÂ® CortexÂ®-M7 STM32H7 Microcontroller IC 32-Bit Single-Core 280MHz 128KB (128K x 8) FLASH 100-LQFP (14x14)", Package="LQFP-100 STMicroelectronics", Check_prices=https://www.snapeda.com/parts/STM32H7B0VBT6/STMicroelectronics/view-part/?ref=eda, Component Type=Standard, Design Item ID=STM32H7B0VBT6, MF=STMicroelectronics, MP=STM32H7B0VBT6, Pin Count=100, SnapEDA_Link=https://www.snapeda.com/parts/STM32H7B0VBT6/STMicroelectronics/view-part/?ref=snap, Source=STM32H7B0VBT6.SchLib
U3: library part CMP-0315-00052-2, "Enhanced Product 3.3 V Can Transceiver with Standby Mode, 17 mA, -55 to 125 degC, 8-pin SOIC (D), Green (RoHS & no Sb/Br)", Drivers Per Package=1, Low Power Mode=Standby, Manufacturer="Texas Instruments", Rating="HiRel Enhanced Product", Supply Voltage(s)(V)=3.3, Code_JEDEC=MS-012AA, ComponentLink1Description=Datasheet, ComponentLink1URL=http://www.ti.com/general/docs/lit/getliterature.tsp?genericPartNumber=SN65HVD230M-EP&fileType=pdf, DatasheetVersion=SGLS356, Eco-Plan="Green (RoHS & no Sb/Br)", ICC(Max)(mA)=17, Isolated=No, Mounting Technology="Surface Mount", PackageDescription="8-Pin Plastic Small Outline Integrated Circuit, 4.9 x 3.9 mm, Pitch 1.27 mm Pitch", PackageReference=D0008A, PackageVersion="revM, Jun-2011", PartNumber=SN65HVD230MDREP, Receivers Per Package=1, SubFamily=CAN, Transient Pulse Protection(V)="-25 to 25"
Y1: "Crystal or Oscillator", Manufacturer_Name=ABRACON, Mouser Part Number=815-ABM8G-12.2-B4Y-T, Arrow Part Number=ABM8G-12.288MHZ-B4Y-T, Arrow Price/Stock=https://www.arrow.com/en/products/abm8g-12.288mhz-b4y-t/abracon, Datasheet Link=https://abracon.com/Resonators/ABM8G.pdf, Height=1mm, Manufacturer_Part_Number=ABM8G-12.288MHZ-B4Y-T, Mouser Price/Stock=https://www.mouser.com/Search/Refine.aspx?Keyword=815-ABM8G-12.2-B4Y-T
Y2: library part CMP-27762-014409-1, "Crystal 32.768kHz ±20ppm (Tol) 6pF FUND 130kΩ 4-Pin SMD T/R", RoHS Compliant=Yes

## Via types
v1: diameter 16, hole 8, Top Layer to Bottom Layer, 228 vias
v2: diameter 36, hole 15, Top Layer to Bottom Layer, 1 vias

## Nets (pads, with @x,y where several pads share a name; then routed paths per layer and width w, separated by ;. In a path a pad name is that pad's centre, name@x,y a point inside that pad or via, vN(x,y) a via of type N, cw(c..) or ccw(c..) an arc to the next point about the centre after c; other vN are vias at no path point)
3v3: C1.1 C2.1 C3.2 C5.1 C6.1 C7.1 C8.2 C9.1 C10.2 C11.1 C12.1 C14.1 C22.1 P4.4 POW.1 POW.2 R3.1 R8.1 S1.3 S1.4 U1.1 U2.6 U2.11 U2.20 U2.21 U2.27 U2.50 U2.75 U2.100 U3.3 | length 6212.9
  Top Layer w7: C8.2 3575.91,2657.4 C7.1 ; R3.1 3582.95,2875.55 3612.4,2905.01 C5.1@3612.4,2944.65 ; C5.1 C5.1@3612.4,2944.65 ; C10.2 3671.5,2755 3688.49,2755 3688.69,2755.19 3716.02,2755.19 U2.20 ; v1(3650,2620) C7.1 ; C11.1 3756.81,2497.4 3784.41,2525 3805,2525 ; v1(3765,3290) 3745.28,3290 3735,3279.72 C14.1 ; U2.100 3783.78,3220.39 3781.77,3222.41 3770.78,3222.41 3735,3258.19 C14.1 ; U2.27 3803.46,2526.54 3805,2525 ; C6.1 v1(3835,2515) 3815,2515 3805,2525 ; U2.50 4256.22,2569.61 4258.23,2567.59 4261.16,2567.59 4326.77,2501.99 4326.77,2457.55 4275.93,2406.72 4261.72,2406.72 v1(4260,2405) ; U2.75 4361.81,3131.22 4388.19,3157.6 C12.1 4402.6,3155 v1(4450,3155) ; v1(4410,3310) 4410.97,3310 4423.56,3322.6 C22.1 4501.09,3322.6 4505.55,3327.05 4505.55,3327.67 4512.87,3335 U3.3 ; v1(5005,3250) 5019.37,3235.67 S1.3 S1.4 ; C5.1@3612.4,2944.65 3622.68,2934.37 U2.11 3785.63,2934.37 3786.26,2935 ; C7.1 3659.72,2657.4 3670,2667.68 3670,2722.24 3684.41,2736.65 3717.16,2736.65 U2.21 U2.20 ; U2.20 3719.86,2759.04 3766.42,2759.04 3786.26,2778.87 3786.26,2935 ; C14.1 3713.31,3270 3652.4,3209.09 3652.4,3163.19 3641.5,3152.28 C3.2 3659.94,3061.55 3659.94,3045.06 3672.2,3032.8 3769.78,3032.8 3797.81,3004.76 3797.81,2946.55 3786.26,2935
  Top Layer w11: C1.1 4545,2687.99 U1.1@4584.69,2727.68
  Top Layer w15: C9.1@4330,2470 4350,2470 4375,2495 v1(4375,2535) ; v1(4505.55,2850) 4540,2850 4584.69,2805.31 U1.1 U1.1@4584.69,2727.68 ; POW.2 POW.1
  Bottom Layer w7: v1(3650,2620) 3710,2620 3815,2515 v1(3835,2515) 3869.5,2549.5 3908.52,2549.5 4053.02,2405 v1(4260,2405) ; v1(3765,3290) 3822.58,3290 3869.5,3336.92 3869.5,3370.5 3845,3395 3818.37,3395 3686.99,3526.38 3686.99,3593.62 3691.38,3598.01 3986.99,3598.01 P4.4 ; v1(4410,3310) 4410,3242.42 4450,3202.42 v1(4450,3155) ; 4480,3185 4545,3250 v1(5005,3250)
  Bottom Layer w15: v1(4375,2535) 4375,2795 4430,2850 v1(4505.55,2850) 4505.55,3099.45 v1(4450,3155) 4480,3185 POW.2
5v: C15.1 C16.1 D1.1 IC1.5 U1.3 | length 817.5
  Top Layer w7: C15.1 4647.4,3025 v1(4685,3025) 4708.05,3025 4750,3066.95 4750,3088.19 4745.9,3092.29 4724.44,3092.29 IC1.5 ; U1.3 4702.8,2822.8 v1(4798.71,2918.71)
  Top Layer w11: C16.1 4748.51,2656.47 4803.74,2711.7 D1.1 4708.71,2727.74 4702.8,2733.66 U1.3
  Bottom Layer w7: v1(4685,3025) 4789.57,2920.43 4796.99,2920.43 v1(4798.71,2918.71)
BOOT0: C21.1 R4.2 S1.1 S1.2 U2.94 | length 1504.6
  Top Layer w7: U2.94 3901.89,3233.35 R4.2@3939.96,3271.42 ; R4.2@3940,3271.42 4172.44,3271.42 4188.37,3287.35 4317.35,3287.35 v1(4350,3320) ; v1(4470,3244.5) 4895.11,3244.5 S1.1 S1.2 4903.94,3548.94 4920,3565 4936.65,3565 C21.1
  Bottom Layer w7: v1(4350,3320) 4350,3321.4 4358.6,3330 4430.51,3330 4470,3290.51 v1(4470,3244.5)
CAN_H: P3.1 R6.2 U3.7 | length 465.7
  Top Layer w15: P3.1 4516.99,3536.99 4511.29,3536.99 4502.5,3528.2 4502.5,3511.99 4532.16,3482.33 4581.41,3482.33 4691.24,3372.5 4707.45,3372.5 4716.24,3381.29 4716.24,3381.67 4719.57,3385 U3.7 4747.13,3385 4750.45,3381.67 4750.45,3381.29 4759.24,3372.5 4790.09,3372.5 4798.88,3381.29 4798.88,3391.12 4809.09,3401.34 R6.2
CAN_L: P3.2 R6.1 U3.6 | length 511.1
  Top Layer w15: P3.2 4452.45,3560 4468.71,3543.74 4477.5,3534.96 4477.5,3501.63 4521.81,3457.33 4571.06,3457.33 4680.88,3347.5 4707.45,3347.5 4716.24,3338.71 4716.24,3338.33 4719.57,3335 U3.6 4747.13,3335 4750.45,3338.33 4750.45,3338.71 4759.24,3347.5 4790.09,3347.5 4798.88,3338.71 4798.88,3328.88 4809.09,3318.66 R6.1
CAN_RX: U2.82 U3.4 | length 439.4
  Top Layer w7: U2.82 4140.12,3198.98 4140.12,3223.54 4191.58,3275 4502.87,3275 4512.87,3285 U3.4
CAN_TX: U2.81 U3.1 | length 653.4
  Top Layer w7: U2.81 4159.81,3198.98 4159.81,3224.81 4199,3264 4550.55,3264 4575,3288.45 4575,3415 4557.66,3432.34 4529.31,3432.34 U3.1
CC1: J1.A5 R1.2 | length 170.1
  Top Layer w7: R1.2 4771.84,2949.5 4795.5,2949.5 4839.84,2905.16 J1.A5
CC2: J1.B5 R2.2 | length 330.3
  Top Layer w7: J1.B5 4985.6,2974.06 4999.78,2988.24 v1(4999.78,3065.22)
  Bottom Layer w7: v1(4856.34,3190) 4876.34,3170 4925,3170 4999.78,3095.22 v1(4999.78,3065.22)
Clock_In: C18.1 U2.8 Y1.1 | length 294.8
  Top Layer w7: U2.8 3747.08,2993.44 v1@3763.65,3010
  Top Layer w11: v1@3763.65,3010 v1(3765,3010)
  Bottom Layer w7: v1(3765,3010) 3839.09,3010 3883.46,3054.37 Y1.1 3895.28,3046.5 C18.1@3978.78,3046.5
Clock_Out: C17.2 U2.9 Y1.3 | length 164.9
  Top Layer w7: U2.9@3718.04,2973.75 3718.65,2974.35 3777.7,2974.35 v1(3778.31,2974.97)
  Bottom Layer w7: C17.2 3726.17,2979.68 3731.35,2974.5 3777.84,2974.5 v1(3778.31,2974.97) ; v1@3778.31,2971.69 3781.59,2974.97 3813.26,2974.97 Y1.3
GND: C1.2 C2.2 C3.1 C5.2 C6.2 C7.2 C8.1 C9.2 C10.1 C11.2 C12.2 C13.1 C14.2 C15.2 C16.2 C17.1 C18.2 C19.1 C20.1 C21.2 C22.2 C23.2 D2.1 D3.1 IC1.2 J1.1 J1.2 J1.A1 J1.A12 J1.B1 J1.B12 J2.6 J2.7 J3.6 J3.7 LED1.1 P4.6 R1.1 R2.1 R4.1 S2.3 S2.4 U1.2 U2.10 U2.19 U2.26 U2.49 U2.74 U2.99 U3.2 U3.8 Y1.2 Y1.4 Y2.2 | length 1759.5
  Top Layer w7: v1(3536.21,2991.21) 3536.21,2946.39 C5.2 ; v1(3645,2964.15) 3647.44,2964.15 3657.53,2954.06 U2.10 3718.12,2953.96 3764.09,2953.96 v1(3764.18,2953.87) ; U2.19 3756.89,2776.89 3766.76,2786.76 v1(3766.76,2825) ; v1(3745,2545) 3746.72,2546.72 3760.9,2546.72 3783.78,2569.61 U2.26 ; v1(3780,3250) 3799.52,3250 C14.2@3803.46,3253.94 ; U2.99 C14.2@3803.46,3253.94 ; C6.2 C6.2@3837.02,2393.53 ; R4.1 3947.95,3330.55 3950,3332.61 v1(3950,3390) ; v1(4215,2470) C9.2 v1(4252.6,2535) 4252.6,2552.49 4248.5,2556.59 4248.41,2556.59 4238.55,2566.46 4238.55,2591.02 U2.49 ; U2.74 4283.46,3111.54 4269.23,3125.77 4269.23,3169.23 v1(4335,3235) 4397.4,3235 C12.2 ; C22.2@4462.6,3395 C22.2 4501.09,3397.4 4505.55,3392.95 4505.55,3392.33 4512.87,3385 U3.2 ; C13.1 4467.48,3137.48 4480,3150 v1(4495,3150) ; LED1.1@4505,2759.45 LED1.1 ; v1(4530,3020) C15.2 ; v1(4570,2925) 4582.48,2925 4643.74,2863.74 ; v2(4643.74,2820.43) 4643.74,2863.74 ; v1(4645,2945) 4655,2955 R1.1 ; v1(4715,2885) 4665,2885 4643.74,2863.74 ; U3.8 v1(4775,3435) ; R2.1 4773.66,3158.66 v1(4755,3140) 4755,3101.61 4760.56,3096.05 4784.07,3096.05 IC1.2 ; v1(4850.31,3094.68) 4870.55,3074.45 J1.2 J1.A12 ; J1.1 J1.A1 4925.63,2814.61 4927.6,2816.57 J1.B12 ; J1.B1 v1(4965,3075) ; C14.2@3803.46,3253.94 3803.46,3263.66 C14.2 3809.8,3260.28 C14.2@3803.46,3253.94
  Top Layer w11: C8.1@3568.5,2590 v1(3570,2588.5)
  other v1: 3660,2120 3730,2120 3800,2120 3875,2120 3940,2120 4025,2120 4125,2120 4220,2120 4280,2120 4350,2120 4395,2120 4455,2120 4565,2120 4650,2120 4725,2120 4780,2120 4865,2135 4960,2135 5050,2135 3465,2170 3530,2170 3590,2170 4865,2190 3465,2210 3530,2210 3590,2210 5016.14,2239.68 3465,2255 3530,2255 3590,2255 4072.41,2275 4140,2275 4765,2290 4830,2290 3465,2295 3530,2295 3590,2295 4415,2305 4035,2335 4765,2335 4830,2335 3465,2340 3530,2340 3590,2340 4225,2345 3745,2370 4330,2375 3465,2390 3530,2390 3590,2390 3655,2390 4030,2400 4765,2400 4975,2405 4370,2420 3530,2440 3590,2440 3655,2440 4765,2445 4105,2450 4030,2480 4975,2495 3655,2505 4025,2540 4190,2540 4610,2545 4340,2560 3650,2582.6 4610,2600 4315,2610 4805,2610 4265,2655 4870,2655 4930,2655 4990,2655 5055,2655 3890,2665 3945,2665 4015,2665 4610,2665 3850,2695 4505,2695 3573.5,2720 4015,2720 4060,2720 4015,2765 4060,2765 4050,2815 5055,2845 4050,2875 4120,2930 4260,2935 4050,2945 4815,2975 4120,2980 4165,2980 4445,2980 3645,3010 4744.8,3009.74 4050,3035 4850,3035 5055,3035 4155,3050 3578.5,3080 3820,3120 3890,3120 3975,3120 4055,3120 4095,3120 4150,3120 4200,3120 3525,3155 5050,3165 3577.6,3175 4335,3175 4970,3185 3535,3300 4610,3310 4975,3310 4275,3375 4330,3375 4385,3375 4975,3405 4275,3415 4330,3415 4385,3415 3545,3440 3610,3440 3665,3440 3875,3450 4065,3455 4180,3455 4275,3460 4330,3460 4385,3460 3785.26,3469.8 4770,3480 3545,3485 3610,3485 3665,3485 4650,3490 4704.74,3490.2 3425,3505 3475,3505 4330,3515 4770,3520 3545,3525 3610,3525 3405,3550 4330,3560 4770,3565 5070,3570 3405,3600 3490,3605 3585,3605 4650,3610 4705,3610 4770,3610 4835,3610 4885,3610
I2C_SCL: P2.1 U2.95 | length 523.7
  Top Layer w7: v1(3882.02,3270) 3881.64,3269.62 3881.64,3197.53 U2.95
  Bottom Layer w7: P2.1 3460,3270 v1(3882.02,3270)
I2C_SDA: P2.2 U2.96 | length 565.3
  Top Layer w7: v1(3850,3345) 3850,3343.88 3862.52,3331.36 U2.96
  Bottom Layer w7: P2.2 3842.56,3350 3847.56,3345 v1(3850,3345)
LP_Clock_In: C20.2 U2.12 Y2.1 | length 203.5
  Top Layer w7: U2.12 v1@3764.83,2914.7
  Top Layer w11: v1@3764.83,2914.7 v1(3765,2914.87)
  Bottom Layer w7: v1@3767.36,2915.88 3835,2915.88 3844.44,2906.44 3844.44,2899.89 Y2.1 3900.32,2896.14 C20.2
  Bottom Layer w11: v1(3765,2914.87) 3766.35,2914.87 v1@3767.36,2915.88
LP_Clock_Out: C19.2 U2.13 Y2.3 | length 196.6
  Top Layer w7: U2.13 3752.58,2894.99 3762.56,2885 v1(3765,2885)
  Bottom Layer w7: v1(3765,2885) 3786.14,2863.86 Y2.3 3821.81,2814.65 3836.46,2800 C19.2
NetC13_2: C13.2 U2.48 U2.73 | length 659.3
  Top Layer w7: U2.48@4214.84,2591.02 U2.48 4216.85,3041.85 4266.85,3091.85 U2.73 4399.37,3091.85 C13.2
NetD1_2: D1.2 J1.A4 J1.A9 J1.B4 J1.B9 | length 600
  Top Layer w11: D1.2 4848.06,2861.63 4871.9,2885.47 J1.A4 4941.05,2885.47 4950.89,2875.63 5005.38,2875.63 5055,2925.25 v1(5055,2985) ; v1(4885,2985) 4886.35,2985 4887.46,2983.9 J1.A9 4929.89,2983.9 4939.74,2993.74 J1.B4
  Bottom Layer w11: v1(4885,2985) v1(5055,2985)
NetD2_2: D2.2 R5.2 | length 68.2
  Top Layer w7: D2.2 3965,2389.53 R5.2
NetD3_2: D3.2 R7.2 | length 82.9
  Top Layer w7: D3.2 3690.47,3360 R7.2@3744.45,3360
NetLED1_2: LED1.2 R8.2 | length 81.2
  Top Layer w7: LED1.2 4442.24,2836.77 R8.2@4445.16,2839.68
NRST: C23.1 P4.2 R3.2 S2.1 S2.2 U2.14 | length 2878.2
  Top Layer w7: R3.2 3582.95,2814.45 3625,2856.5 v1(3625,2871) ; v1(3675,2875) 3675.16,2875.16 3717.87,2875.16 U2.14 ; v1(4720,2520) 4780,2520 4828.7,2568.7 S2.2 S2.1 4903.94,2251.06 4915,2240 4941.02,2240 C23.1
  Bottom Layer w7: v1(3625,2871) 3668.56,2871 3672.56,2875 v1(3675,2875) ; P4.2 3825,3441.91 3901.52,3365.39 3901.52,3256.52 3865,3220 3720,3220 3675,3175 v1(3675,2875) ; v1(4720,2520) 4715.5,2515.5 3969.5,2515.5 3810,2675 3810,2754.18 3701.68,2862.5 3688.66,2862.5 3676.16,2875 v1(3675,2875)
PA0: J2.1 U2.22 | length 768.3
  Top Layer w7: J2.1 3504.5,3035.5 v1(3504.5,2720) ; U2.22 3763.44,2717.83 3765.6,2720 v1(3768.04,2720)
  Bottom Layer w7: v1(3504.5,2720) 3505,2720 3521.51,2736.51 3521.51,2751.51 3536.29,2766.29 3721.75,2766.29 v1(3768.04,2720)
PA4: J2.2 U2.28 | length 1121.5
  Top Layer w7: U2.28 3824.07,2592.11 3824.07,2548.5 v1(3825,2547.58)
  Bottom Layer w7: J2.2 3440,2997.42 3596.92,2840.5 3683.01,2840.5 3697.91,2825.6 3697.91,2802.2 3673,2777.29 3531.73,2777.29 3485,2730.56 3485,2660 3497.71,2647.29 3760.37,2647.29 3825,2582.66 v1(3825,2547.58)
PA5: J2.3 U2.29 | length 703.8
  Top Layer w7: J2.3 3451.73,2900 3485,2933.27 v1(3485,2985) ; v1(3795,2655) 3796.72,2653.28 3816.72,2653.28 3842.66,2627.34 3842.66,2593.21 U2.29
  Bottom Layer w7: v1(3485,2985) 3485,2983.42 3616.92,2851.5 3687.57,2851.5 3795,2744.07 v1(3795,2655)
PA6: J3.3 U2.30 | length 489.3
  Top Layer w7: U2.30 3862.52,2524.92 3870,2517.44 v1(3870,2515)
  Bottom Layer w7: v1(3870,2515) 3870,2425 J3.3
PA7: J3.4 U2.31 | length 454.5
  Top Layer w7: U2.31 3884.22,2591.02 3884.22,2555.78 3900,2540 v1(3900,2495) 3900,2437.49 3899.93,2437.42 3899.93,2372.5 3928.04,2344.38 3953.19,2344.38 3995,2302.58 J3.4
PA8: J3.1 U2.67 | length 1051
  Top Layer w7: v1(4055,2535) 4055,2440 J3.1 ; U2.67 4363.82,2973.74 4367.56,2970 v1(4370,2970)
  Bottom Layer w7: v1(4055,2535) 4055,2657.58 4361.92,2964.5 4362.06,2964.5 4367.56,2970 v1(4370,2970)
PB0: R5.1 U2.34 | length 112.3
  Top Layer w7: U2.34 3941.26,2549.12 3965,2525.38 R5.1
PC2_C: J2.4 U2.17 | length 288
  Top Layer w7: v1(3658.47,2820.16) 3660.91,2820.16 3664.42,2816.65 3717.64,2816.65 U2.17
  Bottom Layer w7: J2.4 3564.44,2800 3584.61,2820.16 v1(3658.47,2820.16)
PC3_C: J2.5 U2.18 | length 316.4
  Top Layer w7: v1(3665.28,2797.15) 3665.57,2796.86 3717.74,2796.86 U2.18
  Bottom Layer w7: J2.5@3440,2705 3523.29,2788.29 3568.29,2788.29 3577.15,2797.15 v1(3665.28,2797.15)
PC9: J3.2 U2.66 | length 1217.8
  Top Layer w7: v1(4100,2535) 4100,2520 4355,2265 4355,2180 4336.59,2161.59 4233.41,2161.59 J3.2 ; U2.66 4358.51,2954.06 4367.56,2945 v1(4370,2945)
  Bottom Layer w7: v1(4100,2535) 4100,2675 v1(4370,2945)
PD12: J3.5 U2.59 | length 1432.7
  Top Layer w7: J3.5 3944.41,2150.59 4341.15,2150.59 4366,2175.44 4366,2269.56 4135,2500.56 v1(4135,2535) ; U2.59 4323.4,2817.69 4364.45,2817.69 v1(4365.88,2819.12)
  Bottom Layer w7: v1(4135,2535) 4135,2675 4279.12,2819.12 v1(4365.88,2819.12)
PE5: R7.1 U2.97 | length 183.5
  Top Layer w7: R7.1 3807.18,3363.37 3807.18,3332.82 3842.83,3297.17 U2.97
Port_D+: IC1.3 J1.A6 J1.B6 | length 339.7
  Top Layer w7: IC1.3 4787.84,3111.96 4804.15,3111.96 4814.5,3101.62 4814.5,3025.5 4875,2965 4875,2936.78 4886.78,2925 4915.63,2925 J1.A6 4939.84,2924.84 4953.74,2938.74 4953.74,2952.95 4955.16,2954.37 J1.B6
Port_D-: IC1.1 J1.A7 J1.B7 | length 296.9
  Top Layer w11: IC1.1 4790,3075 v1(4795,3070) ; v1(4894.81,2944.55) J1.A7 ; J1.B7 4968.58,2915 4970,2916.42 v1(4970,2925)
  Bottom Layer w11: v1(4795,3070) 4795,3044.36 v1(4894.81,2944.55) 4950.45,2944.55 v1(4970,2925)
SPI_CS: P5.1 U2.51 | length 527.6
  Top Layer w7: U2.51 4345.39,2658.78 4405,2599.17 4405,2435 4455,2385 P5.1
SPI_MISO: P5.3 U2.53 | length 671
  Top Layer w7: U2.53 4323.98,2696.14 4348.54,2696.14 4435,2609.68 4435,2450 4480,2405 4480,2340 4618.09,2201.91 4653.09,2201.91 P5.3
SPI_MOSI: P5.4 U2.54 | length 779
  Top Layer w7: U2.54 4323.98,2715.82 4348.54,2715.82 4450,2614.37 4450,2460 4495,2415 4495,2345 4595,2245 4710,2245 P5.4
SPI_SCK: P5.2 U2.52 | length 589.4
  Top Layer w7: U2.52 4323.98,2676.45 4348.54,2676.45 4420,2605 4420,2445 4466,2399 4466,2289 P5.2
SWCLK: P4.5 U2.76 | length 433.2
  Top Layer w7: v1(4255,3244.5) 4255.61,3243.89 4255.61,3197.58 U2.76
  Bottom Layer w7: P4.5 4125,3347.42 4227.42,3245 4254.5,3245 v1(4255,3244.5)
SWDIO: P4.3 U2.72 | length 886.1
  Top Layer w7: v1(4265,3005) 4265,3050 4287.17,3072.17 U2.72
  Bottom Layer w7: P4.3 3925,3210 4130,3005 v1(4265,3005)
SWO: P4.1 U2.89 | length 594.2
  Top Layer w7: P4.1 3800,3485 v1(4000,3485) ; v1(4000,3245) 4000.16,3244.84 4000.16,3197.13 U2.89
  Bottom Layer w7: v1(4000,3245) v1(4000,3485)
UART_RX: P1.2 U2.69 | length 844.7
  Top Layer w7: U2.69 4323.98,3011.1 4388.9,3011.1 4405,2995 4405,2705 4485,2625 4485,2475 4520.23,2439.77 4615.23,2439.77 P1.2
UART_TX: P1.1 U2.68 | length 736.6
  Top Layer w7: U2.68 4323.98,2991.41 4383.59,2991.41 4390,2985 4390,2695 4465,2620 4465,2470 4518.09,2416.91 4538.09,2416.91 P1.1
USB_D+: IC1.4 U2.71 | length 428.9
  Top Layer w7: U2.71 4323.98,3050.47 4352.79,3050.47 4354.62,3048.64 4499.84,3048.64 4551.89,3100.68 4692.05,3100.68 4703.33,3111.96 4719.64,3111.96 IC1.4
USB_D-: IC1.6 U2.70 | length 428.9
  Top Layer w7: U2.70 4323.98,3034.81 4352.79,3034.81 4354.62,3036.64 4504.81,3036.64 4556.86,3088.68 4692.05,3088.68 4703.33,3077.41 4719.64,3077.41 IC1.6
pads on no net: J1.3 J1.4 J1.5 J1.6 J1.A2 J1.A3 J1.A8 J1.A10 J1.A11 J1.B2 J1.B3 J1.B8 J1.B10 J1.B11 U2.1 U2.2 U2.3 U2.4 U2.5 U2.7 U2.15 U2.16 U2.23 U2.24 U2.25 U2.32 U2.33 U2.35 U2.36 U2.37 U2.38 U2.39 U2.40 U2.41 U2.42 U2.43 U2.44 U2.45 U2.46 U2.47 U2.55 U2.56 U2.57 U2.58 U2.60 U2.61 U2.62 U2.63 U2.64 U2.65 U2.77 U2.78 U2.79 U2.80 U2.83 U2.84 U2.85 U2.86 U2.87 U2.88 U2.90 U2.91 U2.92 U2.93 U2.98 U3.5 Y2.4

## Polygon pours and split planes (outlines as drawn)
GND on Top Layer "NONET_L02_P-001" (solid, pour order 1): 3370,3640 3370,2095 5110,2095 5110,3640
GND on Bottom Layer "Ground Pour" (solid, pour order 0): 3370,3640 3370,2095 5110,2095 5110,3640

## Silkscreen, mask and mechanical layers (free items; w line width, h text height)
Top Overlay:
  lines w10: 4020,3270 4365,3270 4365,3345 4250,3345 4240,3355 4240,3410 4235,3415 4020,3415 4020,3270
  text "Debug" at 3442,3550.33 h40
  text "CAN" at 4622,3537 h40
  text "Boot" at 4848,3457 h30 r90
  text "I2C" at 3392,3427 h40
  text "STM32 / H7B0VBT6" at 4030,3280 h40
  text "USART" at 4482,2472 h40
  text "Analog" at 3410.33,2398 h40 r270
  text "Reset" at 4838,2377 h30 r90
  text "Digital" at 3627,2285.33 h40
  text "Designed By / Adit Bhatia" at 4035,2285 h35
  text "SPI" at 4562,2272 h40
Bottom Overlay:
  drawing of 206 lines, arcs and shapes, not listed
  text "CAN_L" at 4458.34,3490 h40 r90
  text "CAN_H" at 4563.34,3490 h40 r90
  text "SWO(PB3)" at 3755,3485 h40 r90
  text "SWDIO(PA13)" at 3955,3485 h40 r90
  text "SWCLK(PA14)" at 4145,3485 h40 r90
  text "GND" at 4245,3485 h40 r90
  text "NRST" at 3840,3480 h40 r90
  text "3.3V" at 4040,3475 h40 r90
  text "(PB9) / SDA" at 3696.61,3300 h40
  text "SCL / (PB8)" at 3686.61,3185 h40
  text "3.3V" at 4595,3115 h40 r90
  text "3.3V" at 4695,3115 h40 r90
  text "PA0" at 3620,3080 h40
  text "PA4" at 3620,2975 h40
  text "MISO(PB14)" at 4275,2950 h40 r90
  text "MOSI(PB15)" at 4345,2946.61 h40 r90
  text "SCK(PB13)" at 4205,2915 h40 r90
  text "CS(PB12)" at 4140,2879.95 h40 r90
  text "PA5" at 3630,2875 h40
  text "PC2_C" at 3700,2781.66 h40
  text "RX(PA10)" at 4675,2750 h40 r90
  text "TX(PA9)" at 4575,2720 h40 r90
  text "PC3_C" at 3705,2681.66 h40
  text "GND" at 3625,2580 h40
  text "GND" at 3620,2485 h40
  text "PD12" at 3915,2415 h40 r90
  text "GND" at 3715,2380 h40 r90
  text "GND" at 3815,2380 h40 r90
  text "PA7" at 4015,2380 h40 r90
  text "PA6" at 4110,2380 h40 r90
  text "PC9" at 4215,2380 h40 r90
  text "PA8" at 4315,2380 h40 r90
Mechanical 1:
  the board outline again, w10

## Dimensions
4395,2250 to 4320,2570 on Bottom Overlay